# Altium PCB LUCID_LIGHT_PCB_Outer.PcbDoc (part 2 of 2)
Units mm, origin at the board's own origin, x right, y up, seen from the top; angles counter-clockwise.
Board outline 85 x 174.55 mm, 4 copper layers (Top Layer, GND, +48V_Fused, Bottom Layer), stack 1.58 mm thick; 120 components, 77 nets, 408 pads, 278 vias.
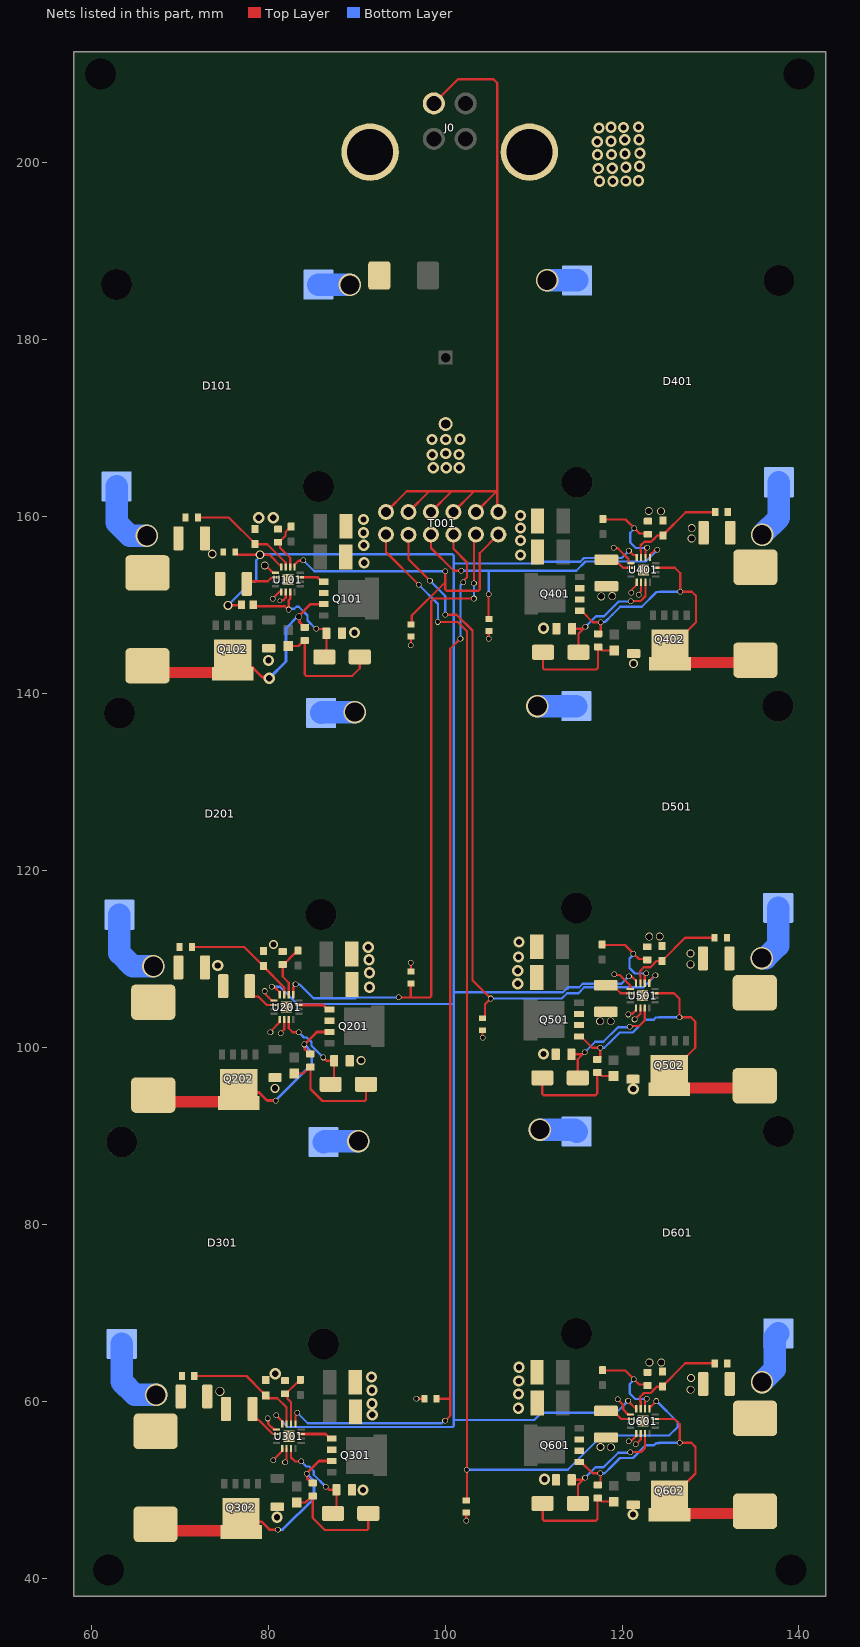
[diagram p4: the nets of this part, all layers, seen from the top]

## Via types
v1: diameter 0.635, hole 0.508, Top Layer to Bottom Layer, tented both sides, 106 vias
v2: diameter 1.27, hole 0.711, Top Layer to Bottom Layer, tented both sides, 105 vias
v3: diameter 0.5, hole 0.2, Top Layer to Bottom Layer, tented both sides, 24 vias
v4: diameter 0.889, hole 0.711, Top Layer to Bottom Layer, tented both sides, 19 vias
v5: diameter 2.54, hole 2.159, Top Layer to Bottom Layer, tented both sides, 12 vias
v6: diameter 1.016, hole 0.711, Top Layer to Bottom Layer, tented both sides, 6 vias
v7: diameter 0.508, hole 0.381, Top Layer to Bottom Layer, tented both sides, 3 vias
v8: diameter 1, hole 0.711, Top Layer to Bottom Layer, tented both sides, 1 vias
v9: diameter 1.016, hole 0.889, Top Layer to Bottom Layer, tented both sides, 1 vias
v10: diameter 0.762, hole 0.635, Top Layer to Bottom Layer, tented both sides, 1 vias

## Nets (pads, with @x,y where several pads share a name; then routed paths per layer and width w, separated by ;. In a path a pad name is that pad's centre, name@x,y a point inside that pad or via, vN(x,y) a via of type N, cw(c..) or ccw(c..) an arc to the next point about the centre after c; other vN are vias at no path point) (continued)
GND: C001.2 C101.2 C102.2 C103.1 C104.1 C106.2 C107.2 C201.2 C202.2 C203.1 C204.2 C206.2 C207.2 C301.2 C302.2 C303.1 C304.2 C306.2 C307.2 C401.2 C402.2 C403.1 C404.2 C406.2 C407.2 C501.2 C502.2 C503.1 C504.2 C506.2 C507.2 C601.2 C602.2 C603.1 C604.2 C606.2 C607.2 D101.1 D201.1 D301.1 D401.1 D501.1 D601.1 J0.2 R103.2 R105.1 R203.2 R205.1 R303.2 R305.1 R403.2 R405.1 R503.2 R505.1 R603.2 R605.1 REFI2.2 TR101.1 TR201.1 TR301.1 TR401.1 TR501.1 TR601.1 U101.9 U101.13 U101.14 U101.17 U201.9 U201.13 U201.14 U201.17 U301.9 U301.13 U301.14 U301.17 U401.9 U401.13 U401.14 U401.17 U501.9 U501.13 U501.14 U501.17 U601.9 U601.13 U601.14 U601.17 | length 60.8
  Top Layer w0.254: v1(79.61,106.4) 79.683,106.327 79.683,106.061 80.414,105.33 U201.9@80.693,105.33 ; v4(79.63,154.49) 79.734,154.49 80.574,153.65 U101.9@80.853,153.65 ; v1(79.96,58.1) 80.033,58.027 80.033,57.484 80.677,56.84 U301.9@80.956,56.84 ; v1(80.28,101.72) 80.353,101.793 80.353,101.916 81.34,102.904 U201.13@81.34,103.183 ; v1(80.52,150.73) 81.293,151.503 U101.13@81.5,151.503 ; v1(80.61,53.37) 80.61,53.421 81.603,54.414 U301.13@81.603,54.693 ; v7(81.32,150.518) 81.341,150.539 81.689,150.539 82,150.85 U101.14@82,151.503 ; v1(81.46,101.61) 81.46,101.713 81.84,102.093 U201.14@81.84,103.183 ; v1(81.92,53.13) 81.92,53.233 82.103,53.416 U301.14@82.103,54.693 ; TR201.1@96.15,108.602 v1(96.15,109.6) ; v1(96.15,145.475) TR101.1@96.15,146.473 ; v1(96.775,60.325) TR301.1@97.698,60.325 ; v1(102.4,46.525) TR601.1@102.4,47.473 ; v1(104.25,101.1) TR501.1@104.25,101.973 ; v1(104.95,146.225) 104.95,147.073 TR401.1@104.975,147.098 ; v1(119.08,156.47) 119.12,156.43 119.52,156.43 120.734,155.216 120.734,154.73 U401.9@121.013,154.73 ; v1(119.14,108.28) 119.213,108.207 119.753,108.207 120.934,107.026 U501.9@120.934,106.639 ; v1(119.51,60.25) 120.134,59.626 120.134,59.103 120.685,58.552 U601.9@120.964,58.552 ; v1@120.67,103.76 120.69,103.76 v1(120.7,103.75) 120.773,103.823 121.191,103.823 121.581,104.213 U501.13@121.581,104.492 ; v1(120.77,55.54) 120.843,55.613 121.098,55.613 121.611,56.126 U601.13@121.611,56.405 ; v1(121.04,151.41) 121.113,151.483 121.113,151.756 121.66,152.304 U401.13@121.66,152.583 ; v1(121.416,103.184) 121.424,103.184 122.081,103.841 U501.14@122.081,104.492 ; v1(121.56,55.17) 122.111,55.721 U601.14@122.111,56.405 ; v1(121.887,151.183) 121.887,151.286 122.16,151.559 U401.14@122.16,152.583
  Bottom Layer w2.54: D101.1@85.695,186.22 85.725,186.19 v5(89.26,186.19) ; D201.1@86.01,137.82 86.1,137.91 v5(89.8,137.91) ; D301.1@86.273,89.33 86.393,89.45 v5(90.22,89.45) ; v5@110.41,138.57 v5(110.439,138.599) D501.1@114.851,138.599 ; v5(110.72,90.73) 114.663,90.73 D601.1@114.881,90.512 ; v5(111.54,186.72) 114.9,186.72 D401.1@114.93,186.69
  other v2: 81.01,46.94 121.25,47.24 90.74,50.02 111.25,51.22 91.78,58.511 108.29,59.25 91.76,59.75 108.3,60.86 91.76,61.29 108.34,62.34 91.7,62.79 80.82,63.15 108.37,63.89 121.26,95.32 111.12,99.29 91.47,106.82 108.22,107.22 91.46,108.47 108.23,108.68 74.31,109.28 91.4,109.92 108.3,110.25 91.34,111.34 108.36,111.95 80.05,143.76 89.78,146.9 111.12,147.39 90.86,154.795 108.54,155.66 90.82,156.78 108.53,157.31 90.8,158.17 108.52,158.72 90.8,159.67 78.957,159.875 80.586,159.887 108.52,160.14 98.68,165.52 100.13,165.53 101.62,165.52 98.55,166.99 101.57,167.02 100.08,167.15 98.52,168.71 100.08,168.73 101.69,168.75 117.45,197.9 118.97,197.9 120.44,197.94 121.87,197.95 117.31,199.33 118.9,199.38 120.44,199.48 121.98,199.59 117.24,200.9 118.81,200.93 120.34,201 122.02,201.06 117.2,202.36 118.76,202.42 120.31,202.58 121.92,202.58 117.4,203.91 120.17,203.97 118.76,204.01 121.86,204.03
  other v3: 82,55.75 82.65,55.775 82.025,56.425 82.65,56.425 122,57.5 122.725,57.525 121.975,58.15 122.7,58.15 81.75,104.325 82.425,104.325 81.75,104.95 82.425,104.975 121.975,105.6 122.625,105.625 121.975,106.225 122.625,106.225 81.95,152.625 82.625,152.65 81.925,153.275 82.6,153.275 122.075,153.675 122.675,153.725 122.075,154.3 122.725,154.3
  other v4: 118.74,54.85 117.56,54.88 127.76,61.35 127.79,62.68 123.09,64.42 124.43,64.42 117.53,102.99 118.73,102.99 127.73,109.41 127.75,110.65 123.08,112.54 124.27,112.56 117.66,151 118.9,151.02 127.87,157.53 127.88,158.7 123.02,160.63 124.41,160.62
  other v6: 80.8,95.4 90.53,98.56 80.62,111.66 121.31,143.39
  other v8: 73.7,155.775
  other v9: 74.55,61.17
LX-1: C105.2 L101.1 Q101.1 Q101.2 Q101.3 Q102.5 Q102.6 U101.3 | length 31.5
  Top Layer w0.305: Q102.5@76.007,144.456 77.505,142.958 78.262,142.958 79.327,141.892 79.988,141.892 v2(80.14,141.74) ; U101.3@83.647,153.15 85.595,153.15 86.09,152.655 Q101.1@86.29,152.655 ; C105.2@84.14,147.5 84.055,147.5 83.827,147.728 83.827,147.813 83.567,148.073 83.567,148.613 v10(83.48,148.7) 83.48,148.79 84.805,150.115 Q101.3@86.29,150.115
  Top Layer w1.27: L101.1@66.379,143.144 67.127,142.396 75.867,142.396 Q102.6@76.007,142.256
  Bottom Layer w0.305: v2(80.14,141.74) 82.043,143.643 82.043,147.386 83.356,148.7 v10(83.48,148.7)
LX-2: C205.2 L201.1 Q201.1 Q201.2 Q201.3 Q202.5 Q202.6 U201.3 | length 31.9
  Top Layer w0.305: Q202.5@76.69,95.95 77.709,94.931 78.999,94.931 79.91,94.02 v1(80.86,94.02) ; U201.3@83.487,104.83 86.225,104.83 86.74,104.315 Q201.1@86.94,104.315 ; C205.2@84.79,99.29 84.705,99.29 84.163,99.832 84.163,100.297 v1(84.1,100.36) 85.515,101.775 Q201.3@86.94,101.775
  Top Layer w1.27: L201.1@67.03,94.64 67.78,93.89 76.55,93.89 Q202.6@76.69,93.75
  Bottom Layer w0.305: v1(80.86,94.02) 84.93,98.09 84.93,99.53 v1(84.1,100.36)
LX-3: C305.2 L301.1 Q301.1 Q301.2 Q301.3 Q302.5 Q302.6 U301.3 | length 29.2
  Top Layer w0.305: Q302.5@77.972,46.441 79.262,46.441 80.173,45.53 v1(81.123,45.53) ; U301.3@83.75,56.34 86.488,56.34 Q301.1@87.003,55.825 ; C305.2@84.968,50.8 84.426,51.342 84.426,51.807 v1(84.363,51.87) 85.778,53.285 Q301.3@87.203,53.285
  Top Layer w1.27: L301.1@68.043,45.4 Q302.6@76.813,45.4
  Bottom Layer w0.305: v1(81.123,45.53) 81.65,45.53 85.193,49.073 85.193,51.04 v1(84.363,51.87)
LX-4: C405.2 L401.1 Q401.1 Q401.2 Q401.3 Q402.5 Q402.6 U401.3 | length 39.1
  Top Layer w0.254: Q401.1@115.22,149.365 115.42,149.365 116.705,148.08 v1(117.61,148.08) 117.61,147.023 117.347,146.76 C405.2@117.3,146.76 117.215,146.76 C405.2@116.952,147.023 ; U401.3@123.807,154.23 125.956,154.23 126.57,153.616 v1(126.57,151.53) 127.87,151.53 128.35,151.05 128.35,148.07 125.87,145.59 Q402.5@125.42,145.59
  Top Layer w1.27: Q402.6@125.42,143.39 125.56,143.53 134.82,143.53 L401.1@135.08,143.79
  Bottom Layer w0.254: v1(117.61,148.08) 117.615,148.085 118.085,148.085 118.907,148.907 119.81,149.81 122.224,149.81 123.902,151.488 124.22,151.488 124.262,151.53 v1(126.57,151.53)
LX-5: C505.2 L501.1 Q501.1 Q501.2 Q501.3 Q502.5 Q502.6 U501.3 | length 37
  Top Layer w0.254: Q501.1@115.341,101.274 116.626,99.989 v1(117.531,99.989) C505.2@117.531,98.932 ; U501.3@123.728,106.139 125.877,106.139 126.491,105.525 v1(126.491,103.439) 127.791,103.439 128.271,102.959 128.271,99.979 Q502.5@125.791,97.499
  Top Layer w1.27: Q502.6@125.481,95.439 L501.1@134.741,95.439
  Bottom Layer w0.254: v1(117.531,99.989) 117.536,99.994 118.006,99.994 118.828,100.817 119.731,101.719 121.207,101.719 122.637,103.149 123.575,103.149 123.823,103.397 124.141,103.397 124.183,103.439 v1(126.491,103.439)
LX-6: C605.2 L601.1 Q601.1 Q601.2 Q601.3 Q602.5 Q602.6 U601.3 | length 37
  Top Layer w0.254: Q601.1@115.371,53.187 116.656,51.902 v1(117.561,51.902) C605.2@117.561,50.845 ; U601.3@123.758,58.052 125.907,58.052 126.521,57.438 v1(126.521,55.352) 127.821,55.352 128.301,54.872 128.301,51.892 Q602.5@125.821,49.412
  Top Layer w1.27: Q602.6@125.511,47.352 L601.1@134.771,47.352
  Bottom Layer w0.254: v1(117.561,51.902) 117.566,51.907 118.036,51.907 118.859,52.73 119.761,53.632 121.237,53.632 122.667,55.062 123.605,55.062 123.853,55.31 124.171,55.31 124.213,55.352 v1(126.521,55.352)
Net402_1: 402.1 C406.1 D401.2 L401.2 | length 6.7
  Bottom Layer w2.54: v5(135.83,157.96) 137.73,159.86 D401.2@137.73,163.89
NetC103_2: C103.2 R101.2 U101.6 | length 5.8
  Top Layer w0.254: C103.2@81.129,157.109 81.171,157.067 81.359,156.879 81.359,156.501 82.516,155.344 82.516,154.592 82.5,154.576 U101.6@82.5,154.297 ; C103.2@81.214,157.109 81.99,157.885 81.99,158.269 82.295,158.574 82.345,158.574 82.618,158.847 R101.2@82.618,158.897
NetC105_1: C105.1 D102.1 R104.1 | length 13.9
  Top Layer w0.254: R104.1@82.289,145.395 83.45,145.395 84.065,146.01 C105.1@84.15,146.01 84.15,142.159 84.299,142.01 89.51,142.01 90.37,142.87 D102.1@90.37,144.15
NetC106_1: C106.1 D101.2 L101.2 R102.1 | length 8.1
  Bottom Layer w2.54: D101.2@62.895,163.42 62.895,159.328 64.383,157.84 v5(66.31,157.84)
NetC107_1: C107.1 U101.10 | length 3.6
  Top Layer w0.254: C107.1@77.6,152.4 77.903,152.703 79.978,152.703 80.331,153.056 80.48,153.056 80.574,153.15 U101.10@80.853,153.15
NetC203_2: C203.2 R201.2 U201.6 | length 6
  Top Layer w0.254: C203.2@81.66,109.38 81.66,108.027 82.34,107.347 U201.6@82.34,105.977 ; C203.2@81.745,109.38 83.002,110.637 83.117,110.637 83.39,110.91 R201.2@83.39,110.96
NetC205_1: C205.1 D202.1 R204.1 | length 13.2
  Top Layer w0.254: R204.1@82.97,97.09 83.985,97.09 84.705,97.81 C205.1@84.79,97.81 84.79,95.34 86.15,93.98 90.921,93.98 91.07,94.129 D202.1@91.07,95.86
NetC206_1: C206.1 D201.2 L201.2 R202.1 | length 8.8
  Bottom Layer w2.54: D201.2@63.21,115.02 63.21,110.688 64.698,109.2 v5(67.04,109.2)
NetC207_1: C207.1 U201.10 | length 4.1
  Top Layer w0.254: C207.1@77.94,106.96 77.94,106.24 78.387,105.793 78.896,105.793 79.859,104.83 U201.10@80.693,104.83
NetC303_2: C303.2 R301.2 U301.6 | length 5.5
  Top Layer w0.254: C303.2@81.923,60.89 81.938,60.89 82.201,60.627 82.201,60.329 82.603,59.927 U301.6@82.603,57.487 ; C303.2@82.008,60.89 R301.2@83.265,62.147
NetC305_1: C305.1 D302.1 R304.1 | length 13.1
  Top Layer w0.254: R304.1@83.233,48.6 84.248,48.6 C305.1@84.968,49.32 ; C305.1@85.053,49.32 85.053,46.85 86.413,45.49 91.184,45.49 91.333,45.639 D302.1@91.333,47.37
NetC306_1: C306.1 D301.2 L301.2 R302.1 | length 8.8
  Bottom Layer w2.54: D301.2@63.473,66.53 63.473,62.248 64.961,60.76 v5(67.36,60.76)
NetC307_1: C307.1 U301.10 | length 4.3
  Top Layer w0.254: C307.1@78.26,59.16 78.26,58.395 78.707,57.948 78.92,57.948 80.527,56.34 U301.10@80.956,56.34
NetC403_2: C403.2 R401.2 U401.6 | length 11
  Top Layer w0.254: R401.2@117.84,159.74 117.89,159.69 120.406,159.69 121.37,158.726 v1(121.37,158.71) 121.386,158.71 121.987,158.109 122.831,158.109 C403.2@122.93,158.01 ; U401.6@122.66,155.377 122.66,156.227 122.83,156.397 v1(122.83,156.5)
  Bottom Layer w0.254: v1(121.37,158.71) 121.37,158.618 120.922,158.17 120.922,157.089 121.541,156.47 122.8,156.47 v1(122.83,156.5)
NetC405_1: C405.1 D402.1 R404.1 | length 12.4
  Top Layer w0.254: D402.1@111.08,144.68 111.08,142.869 111.229,142.72 117.08,142.72 117.28,142.92 117.28,145.26 C405.1@117.3,145.28 ; C405.1@117.385,145.28 117.785,144.88 R404.1@119.12,144.88
NetC407_1: C407.1 U401.10 | length 3.1
  Top Layer w0.254: C407.1@118.24,155.14 118.678,154.702 119.628,154.702 120.1,154.23 U401.10@121.013,154.23
NetC503_2: C503.2 R501.2 U501.6 | length 10.4
  Top Layer w0.254: R501.2@117.811,111.599 120.327,111.599 121.291,110.635 v1(121.291,110.619) 121.307,110.619 121.908,110.018 C503.2@122.752,110.018 ; U501.6@122.581,107.286 122.581,108.136
  Bottom Layer w0.254: v1(121.291,110.619) 121.291,110.527 120.843,110.079 120.843,108.998 121.462,108.379 122.721,108.379 v1(122.751,108.409)
NetC505_1: C505.1 D502.1 R504.1 | length 12.4
  Top Layer w0.254: D502.1@111.001,96.589 111.001,94.778 111.15,94.629 117.001,94.629 117.201,94.829 C505.1@117.201,97.169 ; C505.1@117.306,97.189 117.706,96.789 R504.1@119.041,96.789
NetC506_1: C506.1 D501.2 L501.2 R502.1 | length 6.7
  Bottom Layer w2.54: v5(135.79,110.11) 136.233,110.11 137.651,111.528 D501.2@137.651,115.799
NetC507_1: C507.1 U501.10 | length 2.4
  Top Layer w0.254: C507.1@118.936,107.049 119.846,106.139 U501.10@120.934,106.139
NetC603_2: C603.2 R601.2 U601.6 | length 10.4
  Top Layer w0.254: R601.2@117.841,63.512 120.357,63.512 121.321,62.548 v1(121.321,62.532) 121.337,62.532 121.938,61.931 C603.2@122.782,61.931 ; U601.6@122.611,59.199 122.611,60.049
  Bottom Layer w0.254: v1(121.321,62.532) 121.321,62.44 120.873,61.992 120.873,60.911 121.492,60.292 122.751,60.292 v1(122.781,60.322)
NetC605_1: C605.1 D602.1 R604.1 | length 12.4
  Top Layer w0.254: D602.1@111.031,48.502 111.031,46.691 111.18,46.542 117.031,46.542 117.231,46.742 C605.1@117.231,49.082 ; C605.1@117.336,49.102 117.736,48.702 R604.1@119.071,48.702
NetC606_1: C606.1 D601.2 L601.2 R602.1 | length 6.3
  Bottom Layer w2.54: v5(135.82,62.2) 137.251,63.631 137.251,67.282 D601.2@137.681,67.712
NetC607_1: C607.1 U601.10 | length 2.4
  Top Layer w0.254: C607.1@118.966,58.962 119.876,58.052 U601.10@120.964,58.052
NetF001_1: F001.1 J0.1
OUT-1: R102.2 R103.1 U101.7 | length 12.3
  Top Layer w0.254: R102.2@72.085,159.893 75.596,159.893 78.546,156.943 R103.1@78.546,156.893 79.902,156.893 81.992,154.803 U101.7@81.992,154.58
OUT-2: R202.2 R203.1 U201.7 | length 13.2
  Top Layer w0.254: R202.2@71.41,111.38 77.31,111.38 79.157,109.533 79.207,109.533 79.48,109.26 R203.1@79.48,109.21 79.48,109.16 81.84,106.8 U201.7@81.84,105.977
OUT-3: R302.2 R303.1 U301.7 | length 13.3
  Top Layer w0.254: R302.2@71.673,62.89 77.573,62.89 R303.1@79.42,61.043 ; R303.1@79.743,60.72 79.743,60.67 80.016,60.397 81.043,60.397 82.103,59.337 U301.7@82.103,57.487
OUT-4: 402.2 R403.1 U401.7 | length 11.4
  Top Layer w0.254: U401.7@122.16,155.377 122.16,156.164 122.102,156.222 122.102,156.738 122.53,157.166 123.289,157.166 123.717,157.594 123.717,157.617 123.97,157.87 R403.1@124.62,157.87 ; R403.1@124.62,157.92 127.21,160.51 402.2@130.54,160.51
OUT-5: R502.2 R503.1 U501.7 | length 11.4
  Top Layer w0.254: U501.7@122.081,107.286 122.081,108.073 122.023,108.131 122.023,108.647 122.451,109.075 123.21,109.075 123.638,109.503 123.638,109.526 123.891,109.779 R503.1@124.541,109.779 ; R503.1@124.541,109.829 127.131,112.419 R502.2@130.461,112.419
OUT-6: R602.2 R603.1 U601.7 | length 11.4
  Top Layer w0.254: U601.7@122.111,59.199 122.111,59.986 122.053,60.044 122.053,60.56 122.481,60.988 123.24,60.988 123.668,61.416 123.668,61.439 123.921,61.692 R603.1@124.571,61.692 ; R603.1@124.571,61.742 127.161,64.332 R602.2@130.491,64.332
PWM: J0.3 T001.1 T001.3 T001.5 T001.7 T001.9 T001.11 | length 83.9
  Top Layer w0.254: T001.11@93.33,160.525 95.68,162.875 98.22,162.875 ; T001.9@95.87,160.525 98.22,162.875 ; T001.7@98.41,160.525 100.76,162.875 ; J0.3@98.739,206.697 101.461,209.419 105.485,209.419 105.908,208.996 105.908,162.875 ; T001.5@100.95,160.525 103.3,162.875 ; T001.3@103.49,160.525 105.84,162.875 105.908,162.875 ; T001.1@106.03,160.525 105.908,160.647 105.908,162.875 ; 98.22,162.875 100.76,162.875 ; 100.76,162.875 103.3,162.875 ; 103.3,162.875 105.908,162.875
PWM-1: T001.2 TR101.2 U101.5 | length 37.6
  Top Layer w0.254: U101.5@83,154.297 83,154.576 83.441,155.017 83.897,155.017 v1(83.97,155.09) ; TR101.2@96.15,147.827 96.254,147.931 96.254,148.829 100.02,152.595 ; v1(100.02,153.85) 100.02,152.595 ; T001.2@106.03,157.985 103.921,155.876 103.921,151.774 103.772,151.625 100.169,151.625 100.02,151.774 100.02,152.595
  Bottom Layer w0.254: v1(83.97,155.09) 85.23,153.83 100,153.83 v1(100.02,153.85)
PWM-2: T001.4 TR201.2 U201.5 | length 75.9
  Top Layer w0.254: U201.5@82.84,105.977 82.84,106.787 83.11,107.057 v1(83.11,107.16) ; v1(94.775,105.675) 96.125,105.675 ; TR201.2@96.15,107.248 96.125,107.223 96.125,105.675 ; v1(103.274,152.475) 103.274,157.769 T001.4@103.49,157.985 ; v1(103.275,150.75) 98.75,150.75 98.45,150.45 98.45,105.824 98.301,105.675 96.125,105.675
  Bottom Layer w0.254: v1(83.11,107.16) 83.122,107.148 83.577,107.148 85.148,105.577 89.861,105.577 89.959,105.675 v1(94.775,105.675) ; v1@103.274,150.751 v1@103.274,152.474
PWM-3: T001.6 TR301.2 U301.5 | length 122
  Top Layer w0.254: U301.5@83.103,57.487 83.103,58.43 83.31,58.637 v1(83.31,58.74) ; TR301.2@99.052,60.325 100.55,60.325 100.6,60.375 ; v1(100,57.82) 100.6,58.42 100.6,60.375 ; T001.6@100.95,157.985 100.95,156.363 102.488,154.825 102.488,153.141 102.05,152.703 v1(102.05,152.6) ; v1(101.75,146.225) 100.6,145.075 100.6,60.375
  Bottom Layer w0.254: v1(83.31,58.74) 84.504,57.546 99.623,57.546 99.888,57.811 v1@100,57.811 ; v1(101.75,146.225) 101.75,152.261 102.05,152.561 v1(102.05,152.6)
PWM-4: T001.8 TR401.2 U401.5 | length 36
  Top Layer w0.254: T001.8@98.41,157.985 98.41,156.465 100.985,153.89 v1(101.84,153.89) ; v1(104.925,151.25) 104.925,148.502 TR401.2@104.975,148.452 ; U401.5@123.16,155.377 123.16,155.656 123.706,156.202 123.902,156.202 v1(123.975,156.275)
  Bottom Layer w0.254: v1(101.84,153.89) 104.95,153.89 ; v1(104.925,151.25) 104.95,151.275 104.95,153.89 ; v1(123.975,156.275) 123.975,156.225 122.675,154.925 115.867,154.925 114.832,153.89 104.95,153.89
PWM-5: T001.10 TR501.2 U501.5 | length 80.6
  Top Layer w0.254: T001.10@95.87,157.965 95.87,155.18 v1(98.3,152.75) ; v1(100.025,148.925) 101.3,148.925 103.1,147.125 103.1,107.625 v1(105.175,105.55) 104.529,104.904 104.529,103.529 104.327,103.327 TR501.2@104.25,103.327 ; U501.5@123.081,107.286 123.081,107.565 123.696,108.18 v1(123.78,108.18)
  Bottom Layer w0.254: v1(98.3,152.75) 100.025,151.025 v1(100.025,148.925) ; v1(105.175,105.55) 113.206,105.55 113.816,106.16 115.076,106.16 115.743,106.827 122.427,106.827 v1(123.78,108.18)
PWM-6: T001.12 TR601.2 U601.5 | length 145.3
  Top Layer w0.254: T001.12@93.33,157.985 93.33,155.995 v1(97.025,152.3) ; v1(99.2,148.1) 101.425,148.1 102.475,147.05 v1(102.475,52.3) 102.475,48.902 TR601.2@102.4,48.827 ; U601.5@123.111,59.199 123.111,59.478 123.298,59.478 v1(123.89,60.07)
  Bottom Layer w0.254: v1(97.025,152.3) 99.2,150.125 v1(99.2,148.1) ; v1(102.475,52.3) 113.884,52.3 117.772,56.188 125.343,56.188 126.289,57.134 126.289,57.671 v1(123.89,60.07)
REFI: REF1.2 REFI2.1 U101.8 U201.8 U301.8 U401.8 U501.8 U601.8 | length 245.4
  Top Layer w0.254: v6(75.47,149.98) 76.925,149.98 REF1.2@76.985,150.04 ; REFI2.1@76.302,156.025 76.302,155.948 76.504,155.746 76.581,155.746 76.63,155.697 v6(79.101,155.697) 80.157,155.697 81.5,154.354 U101.8@81.5,154.297 ; v1(80.45,106.88) 80.523,106.807 80.789,106.807 81.34,106.256 U201.8@81.34,105.977 ; v1(80.93,58.45) 80.93,58.439 81.603,57.766 U301.8@81.603,57.487 ; v1(120.68,60.08) 121.561,59.199 U601.8@121.611,59.199 ; v1(120.788,108.088) 120.861,108.015 121.131,108.015 121.581,107.565 U501.8@121.581,107.286 ; v1(120.79,156.15) 121.284,155.656 121.66,155.656 U401.8@121.66,155.377
  Bottom Layer w0.254: v6(75.47,149.98) 78.164,152.674 78.531,152.674 78.68,152.823 78.68,155.069 79.101,155.491 v6(79.101,155.697) 79.164,155.76 100.851,155.76 101,155.611 101,154.72 ; v1(80.45,106.88) 81.35,106.88 83.29,104.94 101,104.94 ; v1(80.93,58.45) 82.24,57.14 100.851,57.14 101,57.288 101,57.92 ; v1(120.68,60.08) 119.34,58.74 110.918,58.74 110.099,57.92 101,57.92 ; v1(120.788,108.088) 119.933,107.233 115.574,107.233 115.168,106.827 113.908,106.827 113.336,106.255 101.015,106.255 101,106.27 ; v1(120.79,156.15) 119.971,155.331 115.699,155.331 115.285,154.918 110.797,154.918 110.574,154.695 101.025,154.695 101,154.72 ; 101,57.92 101,104.94 ; 101,104.94 101,106.27 ; 101,106.27 101,154.72
VCC-1: C104.2 D102.2 REF1.1 U101.15 | length 15
  Top Layer w0.254: REF1.1@78.335,150.04 78.493,149.882 81.88,149.882 82.252,149.51 v1(82.33,149.51) ; v1@82.33,149.617 82.33,150.569 82.5,150.739 U101.15@82.5,151.503 ; v1(85.45,147.34) 85.497,147.293 86.257,147.293 86.595,146.955 86.595,144.375 D102.2@86.37,144.15
  Bottom Layer w0.254: v1(82.33,149.51) 82.403,149.583 82.969,149.583 83.206,149.82 83.46,149.82 84.459,148.821 84.459,148.271 85.39,147.34 v1(85.45,147.34)
VCC-2: C204.1 D202.2 U201.15 | length 10.7
  Top Layer w0.254: U201.15@82.34,103.183 82.34,102.182 82.782,101.74 v1(83.48,101.74) ; v1(86.24,98.89) 86.249,98.89 86.619,98.52 C204.1@87.465,98.52 87.465,96.255 D202.2@87.07,95.86
  Bottom Layer w0.254: v1(83.48,101.74) 84.071,101.149 84.391,101.149 84.91,100.63 84.91,100.22 v1(86.24,98.89)
VCC-3: C304.1 D302.2 U301.15 | length 10.1
  Top Layer w0.254: U301.15@82.603,54.693 82.603,53.692 83.044,53.25 v1(83.743,53.25) ; v1(86.503,50.4) 86.512,50.4 86.882,50.03 C304.1@87.728,50.03 D302.2@87.728,47.765
  Bottom Layer w0.254: v1(83.743,53.25) 84.334,52.659 84.654,52.659 85.173,52.14 85.173,51.73 v1(86.503,50.4)
VCC-4: C404.1 D402.2 U401.15 | length 14.3
  Top Layer w0.254: C404.1@114.365,147.155 C404.1@114.365,147.34 115.537,147.34 ; D402.2@115.08,144.68 115.08,146.78 v1(115.87,147.57) ; v1(120.97,150.458) 122.078,150.458 122.66,151.04 U401.15@122.66,152.583
  Bottom Layer w0.254: v1(115.87,147.57) 117.06,148.76 117.97,148.76 119.62,150.41 120.922,150.41 v1(120.97,150.458)
VCC-5: C504.1 D502.2 U501.15 | length 14.1
  Top Layer w0.254: C504.1@114.286,99.249 115.458,99.249 ; D502.2@115.001,96.589 115.001,98.689 v1(115.791,99.479) ; v1(120.891,102.367) 120.964,102.44 121.95,102.44 122.581,103.071 U501.15@122.581,104.492
  Bottom Layer w0.254: v1(115.791,99.479) 116.981,100.669 117.891,100.669 119.541,102.319 120.843,102.319 v1(120.891,102.367)
VCC-6: C604.1 D602.2 U601.15 | length 14.2
  Top Layer w0.254: C604.1@114.316,51.162 115.488,51.162 ; D602.2@115.031,48.502 115.031,50.602 v1(115.821,51.392) ; v1(120.921,54.28) 120.955,54.314 122.154,54.314 122.611,54.771 U601.15@122.611,56.405
  Bottom Layer w0.254: v1(115.821,51.392) 117.011,52.582 117.921,52.582 119.571,54.232 120.873,54.232 v1(120.921,54.28)
pads on no net: D101.Screw1 D101.Screw2 D201.Screw1 D201.Screw2 D301.Screw1 D301.Screw2 D401.Screw1 D401.Screw2 D501.Screw1 D501.Screw2 D601.Screw1 D601.Screw2 J0.4 J0.5 J0.6 U101.11 U201.11 U301.11 U401.11 U501.11 U601.11

## Polygon pours and split planes (outlines as drawn)
Net402_1 on Top Layer "NET402_1_L01_P153" (solid, pour order 153): 131.826,161.036 ccw(c131.826,160.782) 131.572,160.782 131.572,157.226 ccw(c132.334,157.226) 132.334,156.464 cw(c132.334,156.21) 132.588,156.21 132.588,152.654 ccw(c133.096,152.654) 133.096,152.146 137.16,152.146 ccw(c137.16,152.654) 137.668,152.654 137.668,159.512 ccw(c136.144,159.512) 136.144,161.036
GND on Top Layer "GND_L01_P152" (solid, pour order 152): 72.275,158.825 72.225,158.775 72.225,156.2 72.425,156.2 73.825,154.8 73.825,150.975 75.125,150.975 75.25,151.1 75.25,156.625 74.6,156.625 73.55,157.675 73.55,158.9 72.225,158.9 72.2,158.925
+48V on Top Layer "+48V_L01_P147" (solid, pour order 147): 96.95,188.91 96.95,185.75 99,183.7 99,176.77 101.67,176.77 101.69,176.79 101.64,176.84 101.64,188.94
NetF001_1 on Top Layer "NETF001_1_L01_P146" (solid, pour order 146): 87.555,203.955 88.01,204.41 94.76,204.41 94.76,186.09 93.94,185.27 93.83,185.38 91.3,185.38
GND on Top Layer "GND_L01_P089" (solid, pour order 89): 75.843,57.77 74.483,57.77 73.063,59.19 72.463,59.19 72.463,62.12 72.473,62.11 74.353,62.11 75.886,60.577
GND on Top Layer "GND_L01_P091" (solid, pour order 91): 79.273,62.01 79.293,61.99 82.423,61.99 82.423,63.83 82.453,63.86 79.183,63.86
+48V on Top Layer "+48V_L01_P093" (solid, pour order 93): 83.223,61.17 83.213,61.16 83.221,60.288 86.229,57.07 87.683,57.07 87.683,63.63 87.583,63.53 86.053,63.53 86.053,62.48 85.133,61.56
GND on Top Layer "GND_L01_P095" (solid, pour order 95): 88.923,63.54 88.953,63.51 88.953,57.21 92.863,57.21 92.883,57.23 92.593,57.52 92.593,63.56
+48V on Top Layer "+48V_L01_P097" (solid, pour order 97): 92,56.389 92,51.45 96.123,51.45 96.123,56.36
GND on Top Layer "GND_L01_P099" (solid, pour order 99): 89.013,50.71 89.013,49.37 91.423,49.37 91.403,49.39 91.403,50.71
GND on Top Layer "GND_L01_P101" (solid, pour order 101): 80.233,48.65 81.833,48.65 81.843,48.66 81.903,48.6 81.903,46.26 80.263,46.26 80.233,46.23
CSP-3 on Top Layer "CSP-3_L01_P103" (solid, pour order 103): 75.893,51.34 75.903,51.33 75.903,50.1 79.283,50.1 79.293,50.11 79.293,51.39
LX-3 on Top Layer "LX-3_L01_P105" (solid, pour order 105): 87.813,52.88 87.813,56.21 87.783,56.24 86.573,56.24 86.573,52.87
NetC306_1 on Top Layer "NETC306_1_L01_P107" (solid, pour order 107): 64.743,58.58 64.763,58.56 64.763,54.62 69.783,54.62 69.943,54.78 69.943,58.58 70.043,58.58 70.923,59.46 70.723,59.66 70.723,63.49 67.063,63.49 67.043,63.47
GND on Top Layer "GND_L01_P108" (solid, pour order 108): 81.7,56.73 81.68,56.71 81.68,55.43 83.01,55.43 83.02,55.44 83.02,56.76
GND on Top Layer "GND_L01_P149" (solid, pour order 149): 106.54,204.45 106.5,204.41 106.5,196.98 123.11,196.98 123.21,197.08 122.64,197.65 122.64,204.87
GND on Top Layer "GND_L01_P148" (solid, pour order 148): 97.75,171.82 102.28,171.82 102.43,171.67 102.43,164.6 98.13,164.6 97.91,164.82
NetC606_1 on Top Layer "NETC606_1_L01_P115" (solid, pour order 115): 131.531,64.842 131.531,60.672 131.511,60.652 132.451,59.712 132.451,56.162 137.811,56.162 137.761,56.212 137.761,63.492 134.011,64.072 132.391,64.832
+48V on Top Layer "+48V_L01_P118" (solid, pour order 118): 112.501,64.802 112.521,64.782 112.521,58.312 114.991,58.312 118.341,61.662 118.341,62.372 116.611,62.372 114.151,64.832
+48V on Top Layer "+48V_L01_P127" (solid, pour order 127): 110.491,57.502 110.491,52.542 106.951,52.542 106.951,57.502
LX-6 on Top Layer "LX-6_L01_P124" (solid, pour order 124): 114.511,56.192 114.511,52.852 114.611,52.752 115.831,52.752 115.831,56.202 115.841,56.212
CSP-6 on Top Layer "CSP-6_L01_P136" (solid, pour order 136): 124.301,53.332 124.301,52.042 124.311,52.052 127.731,52.052 127.731,53.312 127.721,53.322
GND on Top Layer "GND_L01_P121" (solid, pour order 121): 111.171,64.812 111.221,64.762 111.221,58.342 107.461,58.342 107.451,58.352 107.451,64.822
GND on Top Layer "GND_L01_P130" (solid, pour order 130): 113.021,51.842 113.021,50.492 113.001,50.512 110.381,50.512 110.381,51.862
GND on Top Layer "GND_L01_P133" (solid, pour order 133): 120.471,48.872 120.481,48.882 122.091,48.882 122.091,46.552 122.081,46.542 122.051,46.572 120.491,46.572
GND on Top Layer "GND_L01_P112" (solid, pour order 112): 122.341,62.942 125.121,62.942 125.121,65.092 124.971,64.942 122.341,64.942
GND on Top Layer "GND_L01_P139" (solid, pour order 139): 129.801,63.332 129.791,63.322 129.791,60.622 127.261,60.622 127.221,60.662 127.231,60.672 127.231,63.322
GND on Top Layer "GND_L01_P142" (solid, pour order 142): 121.721,58.452 121.681,58.412 121.681,57.142 123.021,57.142 123.051,57.172 123.031,57.192 123.031,58.452
GND on Top Layer "GND_L01_P145" (solid, pour order 145): 116.811,56.552 116.831,56.532 116.831,54.282 119.381,54.282 119.581,54.482 119.581,56.552
GND on Top Layer "GND_L01_P144" (solid, pour order 144): 116.781,104.639 116.801,104.619 116.801,102.369 119.351,102.369 119.551,102.569 119.551,104.639
+48V on Top Layer "+48V_L01_P117" (solid, pour order 117): 112.471,112.889 112.491,112.869 112.491,106.399 114.961,106.399 118.311,109.749 118.311,110.459 116.581,110.459 114.121,112.919
LX-4 on Top Layer "LX-4_L01_P123" (solid, pour order 123): 114.56,152.37 114.56,149.03 114.66,148.93 115.88,148.93 115.88,152.38 115.89,152.39
CSP-4 on Top Layer "CSP-4_L01_P135" (solid, pour order 135): 124.35,149.51 124.35,148.22 124.36,148.23 127.78,148.23 127.78,149.49 127.77,149.5
+48V on Top Layer "+48V_L01_P116" (solid, pour order 116): 112.55,160.98 112.57,160.96 112.57,154.49 115.04,154.49 118.39,157.84 118.39,158.55 116.66,158.55 114.2,161.01
+48V on Top Layer "+48V_L01_P092" (solid, pour order 92): 82.96,109.66 82.95,109.65 82.958,108.778 85.966,105.56 87.42,105.56 87.42,112.12 87.32,112.02 85.79,112.02 85.79,110.97 84.87,110.05
LX-2 on Top Layer "LX-2_L01_P104" (solid, pour order 104): 87.55,101.37 87.55,104.7 87.52,104.73 86.31,104.73 86.31,101.36
CSP-2 on Top Layer "CSP-2_L01_P102" (solid, pour order 102): 75.63,99.83 75.64,99.82 75.64,98.59 79.02,98.59 79.03,98.6 79.03,99.88
LX-5 on Top Layer "LX-5_L01_P122" (solid, pour order 122): 114.481,104.279 114.481,100.939 114.581,100.839 115.801,100.839 115.801,104.289 115.811,104.299
CSP-5 on Top Layer "CSP-5_L01_P134" (solid, pour order 134): 124.271,101.419 124.271,100.129 124.281,100.139 127.701,100.139 127.701,101.399 127.691,101.409
+48V on Top Layer "+48V_L01_P126" (solid, pour order 126): 110.461,105.589 110.461,100.629 106.921,100.629 106.921,105.589
GND on Top Layer "GND_L01_P132" (solid, pour order 132): 120.441,96.959 120.451,96.969 122.061,96.969 122.061,94.639 122.051,94.629 122.021,94.659 120.461,94.659
GND on Top Layer "GND_L01_P129" (solid, pour order 129): 112.991,99.929 112.991,98.579 112.971,98.599 110.351,98.599 110.351,99.949
GND on Top Layer "GND_L01_P120" (solid, pour order 120): 111.141,112.899 111.191,112.849 111.191,106.429 107.431,106.429 107.421,106.439 107.421,112.909
GND on Top Layer "GND_L01_P138" (solid, pour order 138): 129.771,111.419 129.761,111.409 129.761,108.709 127.231,108.709 127.191,108.749 127.201,108.759 127.201,111.409
GND on Top Layer "GND_L01_P141" (solid, pour order 141): 121.691,106.539 121.651,106.499 121.651,105.229 122.991,105.229 123.021,105.259 123.001,105.279 123.001,106.539
GND on Top Layer "GND_L01_P111" (solid, pour order 111): 122.311,111.029 125.091,111.029 125.091,113.179 124.941,113.029 122.311,113.029
NetC506_1 on Top Layer "NETC506_1_L01_P114" (solid, pour order 114): 131.501,112.929 131.501,108.759 131.481,108.739 132.421,107.799 132.421,104.249 137.781,104.249 137.731,104.299 137.731,111.579 133.981,112.159 132.361,112.919
GND on Top Layer "GND_L01_P143" (solid, pour order 143): 116.86,152.73 116.88,152.71 116.88,150.46 119.43,150.46 119.63,150.66 119.63,152.73
GND on Top Layer "GND_L01_P140" (solid, pour order 140): 121.77,154.63 121.73,154.59 121.73,153.32 123.07,153.32 123.1,153.35 123.08,153.37 123.08,154.63
GND on Top Layer "GND_L01_P137" (solid, pour order 137): 129.85,159.51 129.84,159.5 129.84,156.8 127.31,156.8 127.27,156.84 127.28,156.85 127.28,159.5
GND on Top Layer "GND_L01_P131" (solid, pour order 131): 120.52,145.05 120.53,145.06 122.14,145.06 122.14,142.73 122.13,142.72 122.1,142.75 120.54,142.75
GND on Top Layer "GND_L01_P128" (solid, pour order 128): 113.07,148.02 113.07,146.67 113.05,146.69 110.43,146.69 110.43,148.04
+48V on Top Layer "+48V_L01_P125" (solid, pour order 125): 110.54,153.68 110.54,148.72 107,148.72 107,153.68
GND on Top Layer "GND_L01_P119" (solid, pour order 119): 111.22,160.99 111.27,160.94 111.27,154.52 107.51,154.52 107.51,161
GND on Top Layer "GND_L01_P110" (solid, pour order 110): 122.39,159.12 125.17,159.12 125.17,161.27 125.02,161.12 122.39,161.12
GND on Top Layer "GND_L01_P109" (solid, pour order 109): 81.44,105.25 81.44,103.89 81.48,103.93 82.77,103.93 82.77,105.26 82.76,105.27
NetC206_1 on Top Layer "NETC206_1_L01_P106" (solid, pour order 106): 64.48,107.07 64.5,107.05 64.5,103.11 69.52,103.11 69.68,103.27 69.68,107.07 69.78,107.07 70.66,107.95 70.46,108.15 70.46,111.98 66.8,111.98 66.78,111.96
GND on Top Layer "GND_L01_P100" (solid, pour order 100): 79.97,97.14 81.57,97.14 81.58,97.15 81.64,97.09 81.64,94.75 80,94.75 79.97,94.72
GND on Top Layer "GND_L01_P098" (solid, pour order 98): 88.75,99.2 88.75,97.86 91.16,97.86 91.14,97.88 91.14,99.2
+48V on Top Layer "+48V_L01_P096" (solid, pour order 96): 91.75,104.879 91.75,99.94 95.86,99.94 95.86,104.85
GND on Top Layer "GND_L01_P094" (solid, pour order 94): 88.66,112.03 88.69,112 88.69,105.7 92.6,105.7 92.62,105.72 92.33,106.01 92.33,112.05
GND on Top Layer "GND_L01_P090" (solid, pour order 90): 79.01,110.5 79.03,110.48 82.16,110.48 82.16,112.32 82.19,112.35 78.92,112.35
GND on Top Layer "GND_L01_P088" (solid, pour order 88): 75.57,105.64 75.55,105.62 74.22,105.62 74.22,106.26 72.8,107.68 72.2,107.68 72.2,110.61 72.21,110.6 74.09,110.6 75.623,109.067
CSP-1 on Top Layer "CSP-1_L01_P082" (solid, pour order 82): 74.914,147.062 78.352,147.062 78.375,147.085 78.375,148.45 74.938,148.45 74.914,148.474
+48V on Top Layer "+48V_L01_P083" (solid, pour order 83): 82.36,157.64 82.231,157.598 82.231,156.76 82.976,156.546 85.163,154.724 85.163,154.009 86.899,154.009 86.978,154.088 86.978,160.422 85.189,160.422 84.904,160.137 84.639,158.382
LX-1 on Top Layer "LX-1_L01_P081" (solid, pour order 81): 85.57,153.123 85.563,153.116 85.563,149.634 87.056,149.634 87.011,149.679 87.011,153.136
GND on Top Layer "GND_L01_P086" (solid, pour order 86): 81.58,153.58 81.59,153.57 81.59,152.23 82.98,152.23 82.97,152.24 82.97,153.61
NetC106_1 on Top Layer "NETC106_1_L01_P085" (solid, pour order 85): 63.912,151.669 63.955,151.712 68.918,151.712 68.918,154.495 70.526,156.103 70.526,158.864 70.568,158.864 71.151,159.447 71.13,159.468 71.13,160.526 63.751,160.526 63.459,160.234
+48V on Top Layer "+48V_L01_P084" (solid, pour order 84): 91.025,153.154 91.025,148.452 91.025,148.295 94.74,148.295 94.74,152.272 94.74,153.26
GND on Top Layer "GND_L01_P080" (solid, pour order 80): 87.877,147.52 87.877,146.155 90.088,146.155 90.444,146.155 90.444,147.58
GND on Top Layer "GND_L01_P079" (solid, pour order 79): 79.279,145.663 80.93,145.663 80.93,142.988 80.91,142.968 80.869,143.009 79.218,143.009 79.218,145.602
GND on Top Layer "GND_L01_P078" (solid, pour order 78): 78.016,158.181 78.034,158.163 81.6,158.175 81.714,160.559 78.028,160.559 78.028,158.175
GND on Top Layer "GND_L01_P077" (solid, pour order 77): 89.655,154.026 89.618,154.063 87.981,154.063 87.981,160.435 88.031,160.485 88.043,160.473 91.694,160.437 91.694,154.026 90.17,154.026
GND on GND "GND_Plane" (solid, pour order 150): 58.09,212.47 58.72,211.84 142.64,211.84 142.64,43.14 142.18,42.68 58.12,42.68
+48V on +48V_Fused "+48V_Plane" (solid, pour order 151): 83.75,212.48 83.75,42.94 83.82,43.01 118.24,43.01 118.24,212.38 118.21,212.41

## Keep-outs
Keep-Out Layer:
  region: 137.09,42.95 137.1,42.96 141.15,42.96 141.15,38.61 141.09,38.55 137.1,38.55
  region: 60,42.95 60.01,42.96 64.06,42.96 64.06,38.61 64,38.55 60.01,38.55
  region: 137.69,211.9 142.41,211.9 142.38,211.87 142.38,207.53 137.71,207.53 137.65,207.59
  region: 59.08,211.95 59.09,211.96 63.14,211.96 63.14,207.61 63.08,207.55 59.09,207.55

## Silkscreen, mask and mechanical layers (free items; w line width, h text height)
LED Cutout Construction:
  circle w0.254: c74.81,78.05 r12
  circle w0.254: c74.58,126.42 r12
  circle w0.254: c126.26,79.09 r12
  circle w0.254: c126.22,127.42 r12
  circle w0.254: c126.31,175.23 r12
  circle w0.254: c74.43,174.87 r12

## Text inside footprints (layer, text, board x,y; h text height)
D101: Mechanical 6 "LED" at 76.581,174.312 h1 r90
D201: Mechanical 6 "LED" at 76.896,125.912 h1 r90
D301: Mechanical 6 "LED" at 77.159,77.422 h1 r90
D401: Mechanical 6 "LED" at 126.838,177.576 h1 r180
D501: Mechanical 6 "LED" at 126.759,129.485 h1 r180
D601: Mechanical 6 "LED" at 126.789,81.398 h1 r180
J0: Top Overlay "+" at 90.93,207.76 h1.5; Top Overlay "-" at 109.26,207.3 h3; Mechanical 6 "Power Connector" at 98.507,198.276 h1
U101: Top Overlay "*" at 85.188,152.535 h1.27 r180; Mechanical 13 "*" at 83.558,152.535 h1.27 r180
U201: Top Overlay "*" at 85.028,104.215 h1.27 r180; Mechanical 13 "*" at 83.398,104.215 h1.27 r180
U301: Top Overlay "*" at 85.291,55.725 h1.27 r180; Mechanical 13 "*" at 83.661,55.725 h1.27 r180
U401: Top Overlay "*" at 125.348,153.615 h1.27 r180; Mechanical 13 "*" at 123.718,153.615 h1.27 r180
U501: Top Overlay "*" at 125.269,105.524 h1.27 r180; Mechanical 13 "*" at 123.639,105.524 h1.27 r180
U601: Top Overlay "*" at 125.299,57.437 h1.27 r180; Mechanical 13 "*" at 123.669,57.437 h1.27 r180